# Altium PCB DSP_Expansion_Board.PcbDoc (part 2 of 3)
Units mil, origin at the board's own origin, x right, y up, seen from the top; angles counter-clockwise.
Board outline 7913.39 x 4448.82 mil, 4 copper layers (Top Layer, GND, inner signal, Bottom Layer), stack 23.78 mil thick; 392 components, 294 nets, 1167 pads, 457 vias.
Unrouted connection lines stored in the file: 108.
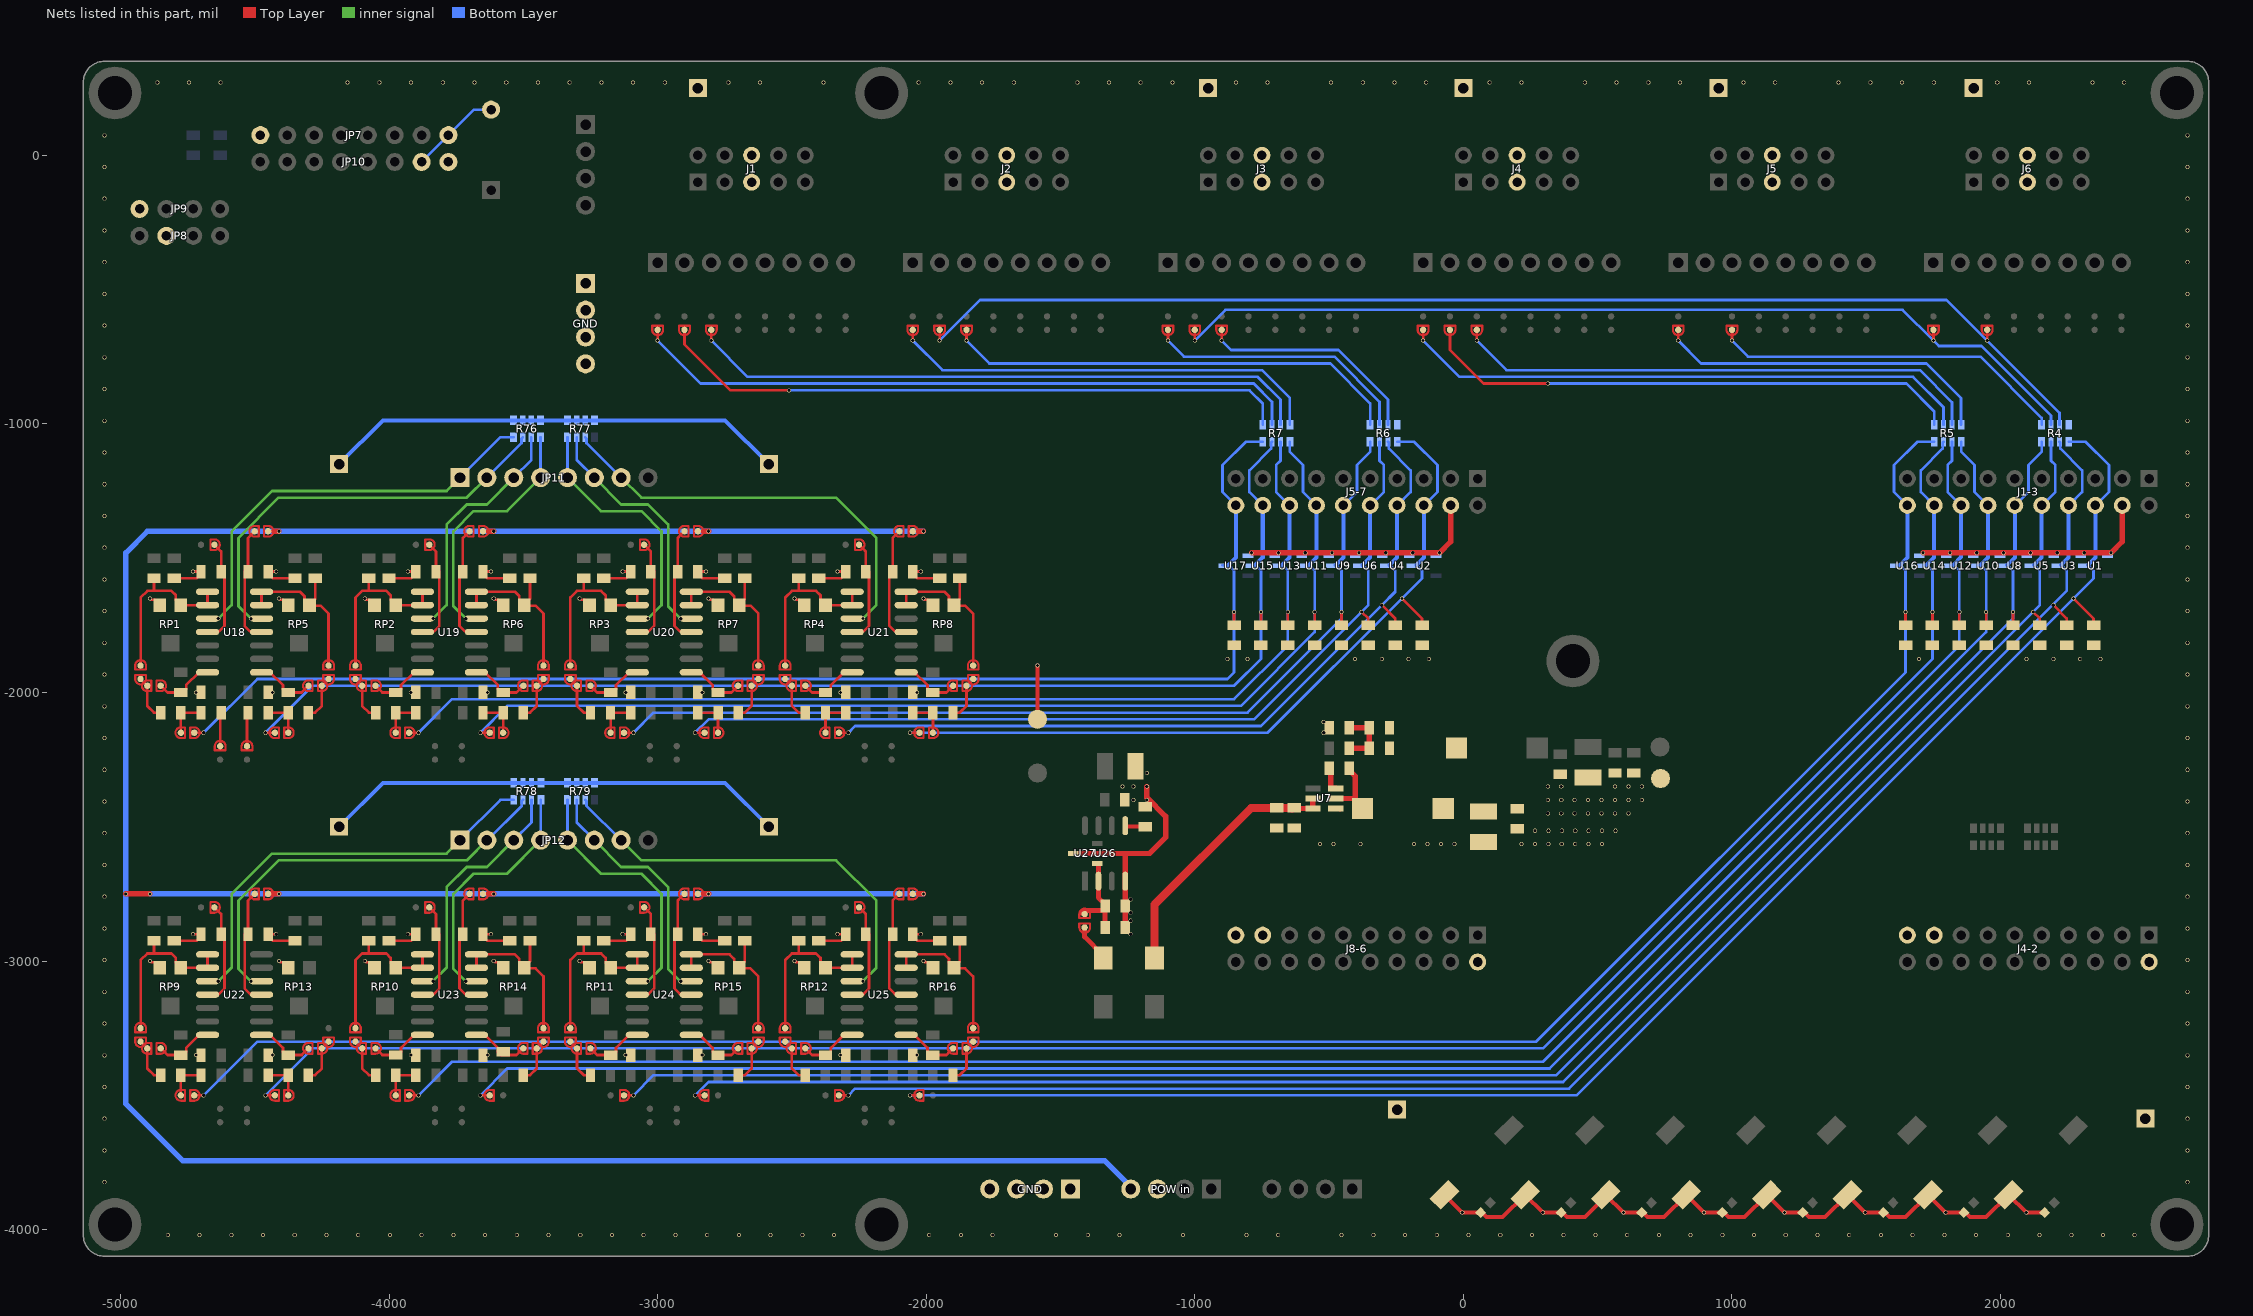
[diagram p4: the nets of this part, all layers, seen from the top]

## Via types
v1: diameter 15, hole 12, Top Layer to Bottom Layer, 457 vias

## Nets (pads, with @x,y where several pads share a name; then routed paths per layer and width w, separated by ;. In a path a pad name is that pad's centre, name@x,y a point inside that pad or via, vN(x,y) a via of type N, cw(c..) or ccw(c..) an arc to the next point about the centre after c; other vN are vias at no path point) (continued)
-12: "POW in.4" DE101.2 DE102.2 DE103.2 DE104.2 DE109.2 DE110.2 DE111.2 DE112.2 | length 12088.2
  Top Layer w20: v1(-4980,-2750) v1(-4890,-2750) ; DE109.2@-4450,-2750 -4430,-2750 v1(-4410,-2750) ; -4430,-1400 v1(-4410,-1400) ; -3630,-2750 v1(-3610,-2750) ; -3630,-1400 v1(-3610,-1400) ; -2830,-2750 v1(-2810,-2750) ; -2830,-1400 v1(-2810,-1400) ; -2030,-2750 v1(-2010,-2750) ; -2030,-1400 v1(-2010,-1400)
  Bottom Layer w20: v1(-4890,-2750) v1(-4410,-2750) v1(-3610,-2750) v1(-2810,-2750) v1(-2010,-2750) ; v1(-2010,-1400) v1(-2810,-1400) v1(-3610,-1400) v1(-4410,-1400) -4900,-1400 -4980,-1480 v1(-4980,-2750) -4980,-3532.15 -4768.85,-3743.3 -1335.44,-3743.3 -1228.74,-3850
A0: JP12.1 R78.1 U22.3 | length 1540.7
  inner signal w10: v1(-4635.58,-3075) -4585.58,-3025 -4585.58,-2750 -4435.58,-2600 -3785.58,-2600 JP12.1@-3735.58,-2550
  Bottom Layer w10: JP12.1@-3735.58,-2550 -3585.58,-2400 R78.1@-3535.58,-2400
A1: JP11.1 R76.1 U18.3 | length 1540.7
  inner signal w10: v1(-4635.58,-1725) -4585.58,-1675 -4585.58,-1400 -4435.58,-1250 -3785.58,-1250 JP11.1@-3735.58,-1200
  Bottom Layer w10: JP11.1@-3736.37,-1200 -3586.37,-1050 R76.1@-3536.37,-1050
A2: JP12.2 R78.2 U22.12 | length 1544.7
  inner signal w10: v1(-4514.09,-3075.48) -4560.58,-3028.99 -4560.58,-2775 -4410.58,-2625 -3710.58,-2625 JP12.2@-3635.58,-2550
  Bottom Layer w10: JP12.2@-3635.58,-2550 -3633.85,-2550 -3505.78,-2421.92 -3505.78,-2404.84 R78.2@-3500.93,-2400
A3: JP12.5 R79.1 U24.3 | length 928.3
  inner signal w10: JP12.5@-3335.58,-2550 -3210.58,-2675 -3060.58,-2675 -2985.58,-2750 -2985.58,-3025 v1(-3035.58,-3075)
  Bottom Layer w10: R79.1@-3335.58,-2400 -3335.18,-2400.39 JP12.5@-3335.18,-2549.61
A4: JP11.2 R76.2 U18.12 | length 1543
  inner signal w10: v1(-4514.09,-1725.48) -4560.58,-1678.99 -4560.58,-1425 -4410.58,-1275 -3710.58,-1275 JP11.2@-3635.58,-1200
  Bottom Layer w10: JP11.2@-3634.64,-1200 -3506.56,-1071.92 -3506.56,-1054.84 R76.2@-3501.72,-1050
A5: JP11.5 R77.1 U20.3 | length 928.3
  inner signal w10: JP11.5@-3335.58,-1200 -3210.58,-1325 -3060.58,-1325 -2985.58,-1400 -2985.58,-1675 v1(-3035.58,-1725)
  Bottom Layer w10: R77.1@-3335.58,-1050 -3335.18,-1050.39 JP11.5@-3335.18,-1199.61
ADC14: R4.8
ADC14~: C35.2 DE96.1 J1-3.6 R4.1 U1.3 | length 5998.2
  Top Layer w10: v1(-2060,-3500) -2045,-3500 DE96.1@-2025,-3500 ; v1(2271.26,-1650) 2346.26,-1725 C35.2@2346.26,-1750
  Bottom Layer w10: v1(-2060,-3500) -2047.16,-3500 421.26,-3500 v1(2271.26,-1650) 2346.26,-1575 2346.26,-1546.26 U1.3@2325.14,-1525.13 ; R4.1@2253.79,-1066.54 2316.78,-1066.54 2403.79,-1153.54 2403.79,-1253.54 J1-3.6@2353.79,-1303.54
  Bottom Layer w15: U1.3@2325.12,-1525.13 2353,-1497.26 J1-3.6@2353,-1323.54
ADC15: R6.8
ADC15~: C36.2 DE72.1 J5-7.6 R6.1 U2.3 | length 2959.6
  Top Layer w10: v1(-2060,-2150) -2045,-2150 DE72.1@-2025,-2150 ; v1(-228.74,-1650) -153.74,-1725 C36.2@-153.74,-1750
  Bottom Layer w10: v1(-2060,-2150) -728.74,-2150 v1(-228.74,-1650) -153.74,-1575 -153.74,-1546.26 -174.86,-1525.13 U2.3@-175.13,-1525.13 ; R6.1@-246.21,-1066.54 -183.22,-1066.54 -96.21,-1153.54 -96.21,-1253.54 J5-7.6@-146.21,-1303.54
  Bottom Layer w15: U2.3@-175.13,-1525.13 -147,-1497 J5-7.6@-147,-1303.32
ADCA0: DE10.1 R5.5 | length 2022.7
  Top Layer w10: DE10.1@-50,-650 -50,-670 -50,-725 75,-850 v1(314.42,-850)
  Bottom Layer w10: v1(314.42,-850) 1649.46,-850 1753,-953.54 R5.5@1753,-1003.54
ADCA0~: C54.2 DE89.1 J1-3.20 R5.4 U16.3 | length 8050.3
  Top Layer w10: DE89.1@-4725,-3500 -4705,-3500 v1(-4690,-3500) ; C54.2@1646.26,-1750 v1(1646.26,-1700)
  Bottom Layer w10: v1(-4690,-3500) -4490,-3300 271.26,-3300 1646.26,-1925 v1(1646.26,-1700) 1646.26,-1546.26 U16.3@1626.49,-1526.49 ; J1-3.20@1653,-1303.54 1603,-1253.54 1603,-1153.54 1690.01,-1066.54 R5.4@1753,-1066.54
  Bottom Layer w15: U16.3@1624.87,-1525.13 1653,-1497 J1-3.20@1653,-1323.54
ADCA1: DE7.1 R7.5 | length 2377.8
  Top Layer w10: DE7.1@-2900,-650 -2900,-670 -2900,-703.74 -2728.74,-875 v1(-2510.58,-875)
  Bottom Layer w10: v1(-2510.58,-875) -795.54,-875 -747,-923.54 R7.5@-747,-1003.54
ADCA1~: C55.2 DE65.1 J5-7.20 R7.4 U17.3 | length 5021.6
  Top Layer w10: DE65.1@-4725,-2150 -4705,-2150 v1(-4690,-2150) ; C55.2@-853.74,-1737.4 v1(-853.74,-1700)
  Bottom Layer w10: v1(-4690,-2150) -4490,-1950 -878.74,-1950 -853.74,-1925 v1(-853.74,-1700) -853.74,-1546.26 -873.51,-1526.49 U17.3@-896.59,-1526.49 ; J5-7.20@-847,-1303.54 -897,-1253.54 -897,-1153.54 -809.99,-1066.54 R7.4@-747,-1066.54
  Bottom Layer w15: U17.3@-875.13,-1525.13 -847,-1497 J5-7.20@-847,-1303.54
ADCA2: DE4.1 R5.6 | length 2145.8
  Top Layer w10: v1(-150,-690) -150,-670 DE4.1@-150,-650
  Bottom Layer w10: v1(-150,-690) -15,-825 1674.46,-825 1787.65,-938.19 R5.6@1787.65,-1003.54
ADCA2~: C52.2 DE90.1 J1-3.18 R5.3 U14.3 | length 7827.1
  Top Layer w10: v1(-4460,-3500) -4445,-3500 DE90.1@-4425,-3500 ; C52.2@1746.26,-1750 v1(1746.26,-1700)
  Bottom Layer w10: v1(-4460,-3500) -4285,-3325 296.26,-3325 1746.26,-1875 v1(1746.26,-1700) 1746.26,-1546.26 U14.3@1726.49,-1526.49 ; J1-3.18@1753,-1303.54 1703,-1253.54 1703,-1173.22 1784.28,-1091.94 1784.28,-1069.9 R5.3@1787.65,-1066.54
  Bottom Layer w15: U14.3@1724.87,-1525.13 1753,-1497 J1-3.18@1753,-1323.54
ADCA3: DE17.1 R4.5 | length 1337.8
  Top Layer w10: v1(1000,-690) 1000,-670 DE17.1@1000,-650
  Bottom Layer w10: v1(1000,-690) 1060,-750 1925,-750 2153,-978 R4.5@2153,-1003.54
ADCA3~: C46.2 DE93.1 J1-3.12 R4.4 U8.3 | length 6654.5
  Top Layer w10: DE93.1@-3125,-3500 -3105,-3500 v1(-3090,-3500) ; C46.2@2046.26,-1750 v1(2046.26,-1700)
  Bottom Layer w10: v1(-3090,-3500) -3015,-3425 -2983.58,-3425 346.26,-3425 2046.26,-1725 v1(2046.26,-1700) 2046.26,-1546.26 U8.3@2026.49,-1526.49 ; J1-3.12@2053.79,-1303.54 2103.79,-1253.54 2103.79,-1153.54 2153,-1104.33 R4.4@2153,-1066.54
  Bottom Layer w15: U8.3@2024.87,-1525.13 2053,-1497 J1-3.12@2053,-1323.54
ADCA4: DE1.1 R7.6 | length 2507.5
  Top Layer w10: v1(-3000,-690) -3000,-670 DE1.1@-3000,-650
  Bottom Layer w10: v1(-3000,-690) -2840,-850 -780.54,-850 -712.35,-918.19 R7.6@-712.35,-1003.54
ADCA4~: C53.2 DE66.1 J5-7.18 R7.3 U15.3 | length 4787.9
  Top Layer w10: v1(-4460,-2150) -4445,-2150 DE66.1@-4425,-2150 ; C53.2@-753.74,-1750 v1(-753.74,-1700)
  Bottom Layer w10: v1(-4460,-2150) -4285,-1975 -853.74,-1975 -753.74,-1875 v1(-753.74,-1700) -753.74,-1546.26 U15.3@-773.51,-1526.49 ; J5-7.18@-747,-1303.54 -797,-1253.54 -797,-1173.22 -715.72,-1091.94 -715.72,-1069.9 R7.3@-712.35,-1066.54
  Bottom Layer w15: U15.3@-775.13,-1525.13 -747,-1497 J5-7.18@-747,-1303.54
ADCA5: DE14.1 R6.5 | length 1719.7
  Top Layer w10: v1(-1850,-690) -1850,-670 DE14.1@-1850,-650
  Bottom Layer w10: v1(-1850,-690) -1765,-775 -495.54,-775 -347,-923.54 R6.5@-347,-1003.54
ADCA5~: C47.2 DE69.1 J5-7.12 R6.4 U9.3 | length 3615.6
  Top Layer w10: DE69.1@-3125,-2150 -3105,-2150 v1(-3090,-2150) ; C47.2@-453.74,-1750 v1(-453.74,-1700)
  Bottom Layer w10: v1(-3090,-2150) -3015,-2075 -803.74,-2075 -453.74,-1725 v1(-453.74,-1700) -453.74,-1546.26 U9.3@-473.51,-1526.49 ; J5-7.12@-446.21,-1303.54 -396.21,-1253.54 -396.21,-1153.54 -347,-1104.33 R6.4@-347,-1066.54
  Bottom Layer w15: U9.3@-475.13,-1525.13 -447,-1497 J5-7.12@-447,-1303.32
ADCB2: DE16.1 R5.7 | length 1988.1
  Top Layer w10: v1(50,-690) 50,-670 DE16.1@50,-650
  Bottom Layer w10: v1(50,-690) 160,-800 1699.46,-800 1819.15,-919.68 R5.7@1819.15,-1003.54
ADCB2~: C50.2 DE91.1 J1-3.16 R5.2 U12.3 | length 7289
  Top Layer w10: DE91.1@-3925,-3500 -3905,-3500 v1(-3890,-3500) ; C50.2@1846.26,-1737.4 v1(1846.26,-1700)
  Bottom Layer w10: v1(-3890,-3500) -3765,-3375 -3004.29,-3375 296.26,-3375 1846.26,-1825 v1(1846.26,-1700) 1846.26,-1546.26 U12.3@1825,-1525 ; R5.2@1819.15,-1066.54 1819.15,-1137.4 1803,-1153.54 1803,-1253.54 J1-3.16@1853,-1303.54
  Bottom Layer w15: U12.3@1824.26,-1525 1853,-1496.26 J1-3.16@1853,-1323.54
ADCB3: DE6.1 DE9.1 R4.6 | length 3512.6
  Top Layer w10: v1(-1000,-690) -1000,-670 DE9.1@-1000,-650 ; v1(1750,-690) 1750,-670 DE6.1@1750,-650
  Bottom Layer w10: v1(-1000,-690) -885.62,-575.62 1635.62,-575.62 v1(1750,-690) 1770,-710 1928.74,-710 2187.65,-968.91 R4.6@2187.65,-1003.54
ADCB3~: C44.2 DE94.1 J1-3.10 R4.3 U5.3 | length 6491.9
  Top Layer w10: v1(-2860,-3500) -2845,-3500 DE94.1@-2825,-3500 ; v1(2121.26,-1700) 2146.26,-1725 C44.2@2146.26,-1750
  Bottom Layer w10: v1(-2860,-3500) -2810,-3450 371.26,-3450 v1(2121.26,-1700) 2146.26,-1675 2146.26,-1546.26 U5.3@2126.49,-1526.49 ; J1-3.10@2153.79,-1303.54 2203.79,-1253.54 2203.79,-1153.54 2187.65,-1137.4 R4.3@2187.65,-1066.54
  Bottom Layer w15: U5.3@2124.87,-1525.13 2153,-1497 J1-3.10@2153,-1323.54
ADCB4: DE13.1 R7.7 | length 2344
  Top Layer w10: v1(-2800,-690) -2800,-670 DE13.1@-2800,-650
  Bottom Layer w10: v1(-2800,-690) -2665,-825 -765.54,-825 -680.85,-909.68 R7.7@-680.85,-1003.54
ADCB4~: C51.2 DE67.1 J5-7.16 R7.2 U13.3 | length 4260.2
  Top Layer w10: DE67.1@-3925,-2150 -3905,-2150 v1(-3890,-2150) ; C51.2@-653.74,-1750 v1(-653.74,-1700)
  Bottom Layer w10: v1(-3890,-2150) -3765,-2025 -853.74,-2025 -653.74,-1825 v1(-653.74,-1700) -653.74,-1546.26 U13.3@-673.51,-1526.49 ; R7.2@-680.85,-1066.54 -680.85,-1137.4 -697,-1153.54 -697,-1253.54 J5-7.16@-647,-1303.54
  Bottom Layer w15: U13.3@-675.13,-1525.13 -647,-1497 J5-7.16@-647,-1303.54
ADCB5: DE3.1 R6.6 | length 1007.5
  Top Layer w10: v1(-1100,-690) -1100,-670 DE3.1@-1100,-650
  Bottom Layer w10: v1(-1100,-690) -1040,-750 -480.54,-750 -312.35,-918.19 R6.6@-312.35,-1003.54
ADCB5~: C45.2 DE70.1 J5-7.10 R6.3 U6.3 | length 3452.9
  Top Layer w10: v1(-2860,-2150) -2845,-2150 DE70.1@-2825,-2150 ; v1(-378.74,-1700) -353.74,-1725 C45.2@-353.74,-1750
  Bottom Layer w10: v1(-2860,-2150) -2810,-2100 -778.74,-2100 v1(-378.74,-1700) -353.74,-1675 -353.74,-1546.26 U6.3@-373.51,-1526.49 ; J5-7.10@-346.21,-1303.54 -296.21,-1253.54 -296.21,-1153.54 -312.35,-1137.4 R6.3@-312.35,-1066.54
  Bottom Layer w15: U6.3@-375.13,-1525.13 -347,-1497 J5-7.10@-347,-1303.32
ADCC2: DE5.1 R5.8 | length 1281.8
  Top Layer w10: v1(800,-690) 800,-670 DE5.1@800,-650
  Bottom Layer w10: v1(800,-690) 885,-775 1724.46,-775 1853,-903.54 1853,-1002.76 R5.8@1853.79,-1003.54
ADCC2~: C48.2 DE92.1 J1-3.14 R5.1 U10.3 | length 7153.8
  Top Layer w10: v1(-3660,-3500) -3645,-3500 DE92.1@-3625,-3500 ; C48.2@1946.26,-1750 v1(1946.26,-1700)
  Bottom Layer w10: v1(-3660,-3500) -3560,-3400 -2993.93,-3400 321.26,-3400 1946.26,-1775 v1(1946.26,-1700) 1946.26,-1546.26 U10.3@1926.49,-1526.49 ; R5.1@1853.79,-1066.54 1853.79,-1104.33 1903,-1153.54 1903,-1253.54 J1-3.14@1953,-1303.54
  Bottom Layer w15: U10.3@1924.87,-1525.13 1953,-1497 J1-3.14@1953,-1323.54
ADCC3: DE8.1 DE18.1 R4.7 | length 4530.2
  Top Layer w10: v1(-1950,-690) -1950,-670 DE8.1@-1950,-650 ; v1(1950,-690) 1950,-670 DE18.1@1950,-650
  Bottom Layer w10: v1(-1950,-690) -1798.9,-538.9 1798.9,-538.9 v1(1950,-690) 2219.15,-959.15 R4.7@2219.15,-1003.54
ADCC3~: C42.2 DE95.1 J1-3.8 R4.2 U3.3 | length 6054.5
  Top Layer w10: DE95.1@-2325,-3500 -2305,-3500 v1(-2290,-3500) ; v1(2196.26,-1675) 2246.26,-1725 C42.2@2246.26,-1750
  Bottom Layer w10: v1(-2290,-3500) -2265,-3475 392.98,-3475 2246.26,-1621.72 2246.26,-1546.26 U3.3@2226.49,-1526.49 ; R4.2@2219.15,-1066.54 2222.51,-1069.9 2222.51,-1091.94 2303.79,-1173.22 2303.79,-1253.54 J1-3.8@2253.79,-1303.54
  Bottom Layer w15: U3.3@2225.01,-1525.25 2253,-1497.26 J1-3.8@2253,-1323.54
ADCC4: DE2.1 R7.8 | length 1631.8
  Top Layer w10: v1(-2050,-690) -2050,-670 DE2.1@-2050,-650
  Bottom Layer w10: v1(-2050,-690) -1940,-800 -750.54,-800 -646.21,-904.33 R7.8@-646.21,-1003.54
ADCC4~: C49.2 DE68.1 J5-7.14 R7.1 U11.3 | length 4114.6
  Top Layer w10: v1(-3660,-2150) -3645,-2150 DE68.1@-3625,-2150 ; C49.2@-553.74,-1750 v1(-553.74,-1700)
  Bottom Layer w10: v1(-3660,-2150) -3560,-2050 -828.74,-2050 -553.74,-1775 v1(-553.74,-1700) -553.74,-1546.26 U11.3@-573.51,-1526.49 ; R7.1@-646.21,-1066.54 -646.21,-1104.33 -597,-1153.54 -597,-1253.54 J5-7.14@-547,-1303.54
  Bottom Layer w15: U11.3@-575.13,-1525.13 -547,-1497 J5-7.14@-547,-1303.54
ADCC5: DE15.1 R6.7 | length 844
  Top Layer w10: v1(-900,-690) -900,-670 DE15.1@-900,-650
  Bottom Layer w10: v1(-900,-690) -865,-725 -465.54,-725 -280.85,-909.69 R6.7@-280.85,-1003.54
ADCC5~: C43.2 DE71.1 J5-7.8 R6.2 U4.3 | length 3017.4
  Top Layer w10: DE71.1@-2325,-2150 -2305,-2150 v1(-2290,-2150) ; v1(-303.74,-1675) -253.74,-1725 C43.2@-253.74,-1750
  Bottom Layer w10: v1(-2290,-2150) -2265,-2125 -753.74,-2125 v1(-303.74,-1675) -253.74,-1625 -253.74,-1546.26 U4.3@-273.51,-1526.49 ; R6.2@-280.85,-1066.54 -277.49,-1069.9 -277.49,-1091.94 -196.21,-1173.22 -196.21,-1253.54 J5-7.8@-246.21,-1303.54
  Bottom Layer w15: U4.3@-275.13,-1525.13 -247,-1497 J5-7.8@-247,-1303.32
B2: JP12.3 R78.3 U23.3 | length 870.6
  inner signal w10: v1(-3835.58,-3075) -3785.58,-3025 -3785.58,-2725 -3710.58,-2650 -3635.58,-2650 JP12.3@-3535.58,-2550
  Bottom Layer w10: JP12.3@-3535.58,-2550 -3469.44,-2483.86 R78.3@-3469.44,-2400
B3: JP12.6 R79.2 U24.12 | length 894.6
  inner signal w10: JP12.6@-3235.58,-2550 -3135.58,-2650 -3035.58,-2650 -2960.58,-2725 -2960.58,-3028.99 v1(-2914.09,-3075.48)
  Bottom Layer w10: R79.2@-3300.93,-2400 -3300.93,-2483.86 JP12.6@-3234.79,-2550
B4: JP11.3 R76.3 U19.3 | length 870.6
  inner signal w10: v1(-3835.58,-1725) -3785.58,-1675 -3785.58,-1375 -3710.58,-1300 -3635.58,-1300 JP11.3@-3535.58,-1200
  Bottom Layer w10: JP11.3@-3536.37,-1200 -3470.22,-1133.86 R76.3@-3470.22,-1050
B5: JP11.6 R77.2 U20.12 | length 894.6
  inner signal w10: JP11.6@-3235.58,-1200 -3135.58,-1300 -3035.58,-1300 -2960.58,-1375 -2960.58,-1678.99 v1(-2914.09,-1725.48)
  Bottom Layer w10: R77.2@-3300.93,-1050 -3300.93,-1133.86 JP11.6@-3234.79,-1200
BL: JP7.8 JP10.7 SW9.2 | length 339.5
  Bottom Layer w10: JP10.7@-3878.74,-25 JP7.8@-3778.74,75 -3683.87,169.87 -3620.13,169.87 SW9.2@-3620,170
C2: JP12.4 R78.4 U23.12 | length 902.9
  inner signal w10: v1(-3714.09,-3075.48) -3760.58,-3028.99 -3760.58,-2750 -3685.58,-2675 -3560.58,-2675 JP12.4@-3435.58,-2550
  Bottom Layer w10: JP12.4@-3435.58,-2550 -3435.18,-2549.61 -3435.18,-2400.39 R78.4@-3434.79,-2400
C3: JP12.7 R79.3 U25.3 | length 1569
  inner signal w10: JP12.7@-3135.58,-2550 -3060.58,-2625 -2335.58,-2625 -2185.58,-2775 -2185.58,-3025 v1(-2235.58,-3075)
  Bottom Layer w10: R79.3@-3269.44,-2400 -3264.59,-2404.84 -3264.59,-2421.92 JP12.7@-3136.52,-2550
C4: JP11.4 R76.4 U19.12 | length 902.3
  inner signal w10: v1(-3714.09,-1725.48) -3760.58,-1678.99 -3760.58,-1400 -3685.58,-1325 -3560.58,-1325 JP11.4@-3435.58,-1200
  Bottom Layer w10: JP11.4@-3435.97,-1199.61 -3435.97,-1050.39 R76.4@-3435.58,-1050
C5: JP11.7 R77.3 U21.3 | length 1569
  inner signal w10: JP11.7@-3135.58,-1200 -3060.58,-1275 -2335.58,-1275 -2185.58,-1425 -2185.58,-1675 v1(-2235.58,-1725)
  Bottom Layer w10: R77.3@-3269.44,-1050 -3264.59,-1054.84 -3264.59,-1071.92 JP11.7@-3136.52,-1200
DAC1: J4-2.17
DAC2: J4-2.19
DAC3: J8-6.17
DAC4: J8-6.19
GND: "POW in.3" C3.1 C4.1 C5.1 C6.1 C7.1 C8.1 C9.1 C10.1 C11.2 C12.2 C13.2 C14.2 C15.2 C16.2 C17.2 C18.2 C19.1 C20.1 C21.1 C22.1 C23.1 C24.1 C25.1 C26.1 C27.1 C28.1 C29.1 C30.1 C31.1 C32.1 C33.1 C34.1 C35.1 C36.1 C37.1 C38.1 C39.1 C40.1 C41.1 C42.1 C43.1 C44.1 C45.1 C46.1 C47.1 C48.1 C49.1 C50.1 C51.1 C52.1 C53.1 C54.1 C55.1 GND.1 GND.2 GND.3 GND.4 J1-3.4 J1.5 J1.6 J2.5 J2.6 J3.5 J3.6 J4-2.2 J4.5 J4.6 J5-7.4 J5.5 J5.6 J6.5 J6.6 J8-6.2 JP7.1 JP8.2 JP9.1 JP10.8 R3.1 R8.2 R9.2 R10.2 R11.2 R12.2 R13.2 R14.2 R15.2 R40.2 R41.2 R42.2 R43.2 R44.2 R45.2 R46.2 R47.2 R76.5 R76.6 R76.7 R76.8 R77.5 R77.6 R77.7 R77.8 R78.5 R78.6 R78.7 R78.8 R79.5 R79.6 R79.7 R79.8 R81.1 R82.1 R85.1 R86.1 R89.1 R90.1 R93.1 R94.1 R97.1 R98.1 R101.1 R102.1 R105.1 R106.1 R109.1 R110.1 RP1.3 RP2.3 RP3.3 RP4.3 RP5.3 RP6.3 RP7.3 RP8.3 RP9.3 RP10.3 RP11.3 RP12.3 RP13.3 RP14.3 RP15.3 RP16.3 SW1.2 SW2.2 SW3.2 SW4.2 SW5.2 SW6.2 SW7.2 SW8.2 U1.1 U2.1 U3.1 U4.1 U5.1 U6.1 U7.4 U8.1 U9.1 U10.1 U11.1 U12.1 U13.1 U14.1 U15.1 U16.1 U17.1 U26.4 U27.3 | length 13268.1
  Top Layer w10: v1(-4890,-3000) -4888.65,-3000 -4884.24,-3004.41 -4872.36,-3004.41 -4853.74,-3023.03 RP9.3@-4853.74,-3025 ; v1(-4890,-1650) -4888.65,-1650 -4884.24,-1654.41 RP1.3@-4872.36,-1654.41 ; R97.1@-4800,-2925 -4717.5,-2925 -4700,-2907.5 C27.1@-4700,-2900 v1(-4730,-2900) ; R81.1@-4800,-1575 -4717.5,-1575 -4700,-1557.5 C19.1@-4700,-1550 v1(-4730,-1550) ; C31.1@-4450,-2907.5 -4432.5,-2925 R98.1@-4350,-2925 ; C31.1@-4450,-2900 v1(-4420,-2900) ; C23.1@-4450,-1557.5 -4432.5,-1575 R82.1@-4350,-1575 ; C23.1@-4450,-1550 v1(-4420,-1550) ; v1(-4410,-3000) -4408.65,-3000 -4404.24,-3004.41 -4393.62,-3004.41 -4375,-3023.03 RP13.3@-4375,-3025 ; v1(-4410,-1650) -4408.65,-1650 -4404.24,-1654.41 RP5.3@-4393.62,-1654.41 ; v1(-4090,-3000) -4088.65,-3000 -4084.24,-3004.41 RP10.3@-4072.36,-3004.41 ; v1(-4090,-1650) -4088.65,-1650 -4084.24,-1654.41 RP2.3@-4072.36,-1654.41 ; R101.1@-4000,-2925 -3917.5,-2925 -3900,-2907.5 C28.1@-3900,-2900 v1(-3930,-2900) ; R85.1@-4000,-1575 -3917.5,-1575 -3900,-1557.5 C20.1@-3900,-1550 v1(-3930,-1550) ; C32.1@-3650,-2907.5 -3632.5,-2925 R102.1@-3550,-2925 ; C32.1@-3650,-2900 v1(-3620,-2900) ; C24.1@-3650,-1557.5 -3632.5,-1575 R86.1@-3550,-1575 ; C24.1@-3650,-1550 v1(-3620,-1550) ; v1(-3610,-3000) -3608.65,-3000 -3604.24,-3004.41 RP14.3@-3593.62,-3004.41 ; v1(-3610,-1650) -3608.65,-1650 -3604.24,-1654.41 RP6.3@-3593.62,-1654.41 ; v1(-3290,-3000) -3288.65,-3000 -3284.24,-3004.41 RP11.3@-3272.36,-3004.41 ; v1(-3290,-1650) -3288.65,-1650 -3284.24,-1654.41 RP3.3@-3272.36,-1654.41 ; R105.1@-3200,-2925 -3117.5,-2925 -3100,-2907.5 C29.1@-3100,-2900 v1(-3130,-2900) ; R89.1@-3200,-1575 -3117.5,-1575 -3100,-1557.5 C21.1@-3100,-1550 v1(-3130,-1550) ; C33.1@-2850,-2907.5 -2832.5,-2925 R106.1@-2750,-2925 ; C33.1@-2850,-2900 v1(-2820,-2900) ; C25.1@-2850,-1557.5 -2832.5,-1575 R90.1@-2750,-1575 ; C25.1@-2850,-1550 v1(-2820,-1550) ; v1(-2810,-3000) -2808.65,-3000 -2804.24,-3004.41 RP15.3@-2793.62,-3004.41 ; v1(-2810,-1650) -2808.65,-1650 -2804.24,-1654.41 RP7.3@-2793.62,-1654.41 ; v1(-2490,-3000) -2488.65,-3000 -2484.24,-3004.41 RP12.3@-2472.36,-3004.41 ; v1(-2490,-1650) -2488.65,-1650 -2484.24,-1654.41 RP4.3@-2472.36,-1654.41 ; R109.1@-2400,-2925 -2317.5,-2925 -2300,-2907.5 C30.1@-2300,-2900 v1(-2330,-2900) ; R93.1@-2400,-1575 -2317.5,-1575 -2300,-1557.5 C22.1@-2300,-1550 v1(-2330,-1550) ; C26.1@-2050,-1557.5 -2032.5,-1575 R94.1@-1950,-1575 ; C26.1@-2050,-1550 v1(-2020,-1550) ; v1(-2020,-2900) C34.1@-2050,-2900 -2050,-2907.5 -2032.5,-2925 R110.1@-1950,-2925 ; v1(-2010,-3000) -2008.65,-3000 -2004.24,-3004.41 RP16.3@-1993.62,-3004.41 ; v1(-2010,-1650) -2008.65,-1650 -2004.24,-1654.41 RP8.3@-1993.62,-1654.41
  Top Layer w15: GND.1@-1585.58,-2100 v1(-1585.58,-1900) ; U7.4@-475,-2432.09 -463.33,-2432.09 U7.4@-460,-2435.41 ; SW1.2@-70.21,-3870.21 v1(-4.23,-3936.19) 68.96,-3936.19 86.31,-3953.54 146.46,-3953.54 SW2.2@229.79,-3870.21 v1(295.77,-3936.19) 368.96,-3936.19 386.31,-3953.54 453,-3953.54 529.79,-3876.76 SW3.2@529.79,-3870.21 v1(595.77,-3936.19) 668.96,-3936.19 686.31,-3953.54 746.46,-3953.54 SW4.2@829.79,-3870.21 v1(895.77,-3936.19) 968.96,-3936.19 986.31,-3953.54 1046.46,-3953.54 SW5.2@1129.79,-3870.21 v1(1195.77,-3936.19) 1268.96,-3936.19 1286.31,-3953.54 1346.46,-3953.54 SW6.2@1429.79,-3870.21 v1(1495.77,-3936.19) 1568.96,-3936.19 1586.31,-3953.54 1646.46,-3953.54 SW7.2@1729.79,-3870.21 v1(1795.77,-3936.19) 1868.96,-3936.19 1886.31,-3953.54 1946.46,-3953.54 SW8.2@2029.79,-3870.21 v1(2095.77,-3936.19) C11.2@2163.81,-3936.19
  Top Layer w20: U27.3@-1451.93,-2599.41 -1258.74,-2599.41 ; C38.1@-1259.02,-2875 -1258.92,-2874.9 -1258.92,-2702.85 U26.4@-1258.82,-2702.76 -1258.82,-2599.49 -1258.74,-2599.41 ; v1(-1178.74,-2350) -1178.74,-2391.41 -1108.74,-2461.41 -1108.74,-2540 -1168.15,-2599.41 -1258.74,-2599.41 ; v1(-788.74,-1480) v1(-688.74,-1480) v1(-588.74,-1480) v1(-488.74,-1480) v1(-388.74,-1480) v1(-288.74,-1480) v1(-188.74,-1480) v1(-88.74,-1480) -47,-1438.26 J5-7.4@-47,-1303.54 ; v1(1711.26,-1480) v1(1811.26,-1480) v1(1911.26,-1480) v1(2011.26,-1480) v1(2111.26,-1480) v1(2211.26,-1480) v1(2311.26,-1480) v1(2411.26,-1480) 2453,-1438.26 J1-3.4@2453,-1303.54
  Bottom Layer w15: GND.1@-4185.58,-2500 -4022.59,-2337.01 R78.8@-3535.58,-2337.01 R78.7@-3500.93,-2337.01 R78.6@-3469.44,-2337.01 R78.5@-3434.79,-2337.01 R79.8@-3335.58,-2337.01 R79.7@-3300.93,-2337.01 R79.6@-3269.44,-2337.01 R79.5@-3234.79,-2337.01 -2748.57,-2337.01 GND.1@-2585.58,-2500 ; GND.1@-4185.58,-1150 -4022.59,-987.01 ; R76.8@-3535.58,-987.01 -4022.59,-987.01 ; R76.7@-3500.93,-987.01 -4022.59,-987.01 ; R76.6@-3469.44,-987.01 -4022.59,-987.01 ; GND.1@-2585.58,-1150 -2748.57,-987.01 R77.5@-3234.79,-987.01 R77.6@-3269.44,-987.01 R77.7@-3300.93,-987.01 R77.8@-3335.58,-987.01 -4022.59,-987.01
  other v1: -4823.37,-4020.08 -4705.26,-4020.08 -4587.15,-4020.08 -4469.04,-4020.08 -4350.93,-4020.08 -4232.82,-4020.08 -4114.71,-4020.08 -3996.6,-4020.08 -3878.49,-4020.08 -3760.38,-4020.08 -3642.27,-4020.08 -3524.16,-4020.08 -3406.05,-4020.08 -3287.94,-4020.08 -3169.83,-4020.08 -3051.72,-4020.08 -2933.61,-4020.08 -2815.5,-4020.08 -2697.39,-4020.08 -2579.28,-4020.08 -2461.17,-4020.08 -2343.06,-4020.08 -1988.73,-4020.08 -1870.62,-4020.08 -1752.51,-4020.08 -1516.29,-4020.08 -1398.18,-4020.08 -1280.07,-4020.08 -1043.85,-4020.08 -807.63,-4020.08 -689.52,-4020.08 -453.3,-4020.08 -335.18,-4020.08 -217.07,-4020.08 -98.96,-4020.08 19.15,-4020.08 137.26,-4020.08 255.37,-4020.08 373.48,-4020.08 491.59,-4020.08 609.7,-4020.08 727.81,-4020.08 845.92,-4020.08 964.03,-4020.08 1082.14,-4020.08 1200.25,-4020.08 1318.36,-4020.08 1436.47,-4020.08 1554.58,-4020.08 1672.69,-4020.08 1790.8,-4020.08 1908.91,-4020.08 2027.02,-4020.08 2145.13,-4020.08 2263.24,-4020.08 2381.35,-4020.08 2499.46,-4020.08 -5059.59,-3823.23 2696.31,-3823.23 -5059.59,-3705.12 2696.31,-3705.12 -5059.59,-3587.01 2696.31,-3587.01 -5059.59,-3468.9 2696.31,-3468.9 -5059.59,-3350.79 2696.31,-3350.79 -4718.74,-3350 -4433.74,-3350 -3918.74,-3350 -3633.74,-3350 -3118.74,-3350 -2833.74,-3350 -2318.74,-3350 -2033.74,-3350 -5059.59,-3232.68 2696.31,-3232.68 -5059.59,-3114.57 2696.31,-3114.57 -5059.59,-2996.46 2696.31,-2996.46 -1238.74,-2900 -5059.59,-2878.35 2696.31,-2878.35 -1238.74,-2850 -1238.74,-2820 -1238.74,-2770 -5059.59,-2760.24 2696.31,-2760.24 -5059.59,-2642.13 2696.31,-2642.13 -533.82,-2564.51 -483.82,-2564.51 -383.82,-2564.51 -183.82,-2564.51 -133.82,-2564.51 -83.82,-2564.51 -33.82,-2564.51 216.18,-2564.51 266.18,-2564.51 316.18,-2564.51 366.18,-2564.51 416.18,-2564.51 466.18,-2564.51 516.18,-2564.51 -5059.59,-2524.02 2696.31,-2524.02 266.55,-2514.87 316.55,-2514.87 366.55,-2514.87 416.55,-2514.87 466.55,-2514.87 516.55,-2514.87 566.55,-2514.87 314.42,-2450 364.42,-2450 414.42,-2450 464.42,-2450 514.42,-2450 564.42,-2450 614.42,-2450 -5059.59,-2405.91 2696.31,-2405.91 -1228.74,-2400 -1178.74,-2400 314.42,-2400 364.42,-2400 414.42,-2400 464.42,-2400 514.42,-2400 564.42,-2400 614.42,-2400 664.42,-2400 -1268.74,-2350 -1228.74,-2350 314.42,-2350 364.42,-2350 564.42,-2350 614.42,-2350 664.42,-2350 -1178.74,-2300 -5059.59,-2287.8 2696.31,-2287.8 -5059.59,-2169.69 2696.31,-2169.69 -520,-2150 -520,-2110 -5059.59,-2051.57 2696.31,-2051.57 -4718.74,-2000 -4433.74,-2000 -3918.74,-2000 -3633.74,-2000 -3118.74,-2000 -2833.74,-2000 -2318.74,-2000 -2033.74,-2000 -5059.59,-1933.46 2696.31,-1933.46 -878.74,-1875 -803.74,-1875 -403.74,-1875 -303.74,-1875 -203.74,-1875 -128.74,-1875 1696.26,-1875 2096.26,-1875 2196.26,-1875 2296.26,-1875 2371.26,-1875 -5059.59,-1815.35 2696.31,-1815.35 -5059.59,-1697.24 2696.31,-1697.24 -5059.59,-1579.13 2696.31,-1579.13 -5059.59,-1461.02 2696.31,-1461.02 -5059.59,-1342.91 2696.31,-1342.91 -5059.59,-1224.8 2696.31,-1224.8 -5059.59,-1106.69 2696.31,-1106.69 -5059.59,-988.58 2696.31,-988.58 -5059.59,-870.47 2696.31,-870.47 -5059.59,-752.36 2696.31,-752.36 -5059.59,-634.25 2696.31,-634.25 -5059.59,-516.14 2696.31,-516.14 -5059.59,-398.03 2696.31,-398.03 -5059.59,-279.92 2696.31,-279.92 -5059.59,-161.81 2696.31,-161.81 -5059.59,-43.7 2696.31,-43.7 -5059.59,74.41 2696.31,74.41 -4862.74,271.26 -4744.63,271.26 -4626.52,271.26 -4154.08,271.26 -4035.97,271.26 -3917.86,271.26 -3799.75,271.26 -3681.64,271.26 -3563.53,271.26 -3445.42,271.26 -3327.31,271.26 -3209.2,271.26 -3091.09,271.26 -2972.98,271.26 -2736.76,271.26 -2618.65,271.26 -2382.43,271.26 -2028.1,271.26 -1909.99,271.26 -1791.88,271.26 -1673.77,271.26 -1437.55,271.26 -1319.44,271.26 -1201.33,271.26 -1083.22,271.26 -847,271.26 -728.89,271.26 -492.67,271.26 -374.55,271.26 -256.44,271.26 -138.33,271.26 97.89,271.26 216,271.26 452.22,271.26 570.33,271.26 688.44,271.26 806.55,271.26 1042.77,271.26 1160.88,271.26 1397.1,271.26 1515.21,271.26 1633.32,271.26 1751.43,271.26 1987.65,271.26 2105.76,271.26 2341.98,271.26 2460.09,271.26
NetC1_1: C1.1 R1.1 R2.2 R3.2 | length 225
  Top Layer w20: R2.2@-425,-2207.09 R1.1@-350,-2207.09 C1.1@-350,-2132.09 R3.2@-425,-2132.09
NetC1_2: C1.2 C5.2 C6.2 L1.2 L2.1 R1.2
NetC2_1: C2.1 U7.6 | length 95.8
  Top Layer w20: C2.1@-499.8,-2282.09 -496.67,-2285.22 -496.67,-2296.87 -493.54,-2300 -493.54,-2356.46 -492.72,-2357.28 U7.6@-475,-2357.28
NetC2_2: C2.2 L1.1 U7.5 | length 237.2
  Top Layer w20: U7.5@-475,-2394.69 -412.4,-2394.69 -404.37,-2402.72 L1.1@-375,-2432.09 ; C2.2@-425,-2282.09 -425,-2289.59 -403,-2311.59 L1.1@-403,-2394.69
NetC3_2: C3.2 C4.2 D1.2 U7.2 U7.3 | length 965.9
  Top Layer w20: C3.2@-630,-2430 ccw(c-627.91,-2430) -627.91,-2432.09 U7.3@-560.47,-2432.09 ; U7.3@-559.65,-2432.09 U7.3@-560.47,-2432.09 ; U7.2@-559.65,-2394.69 ccw(c-559.65,-2395.51) -560.47,-2395.51 U7.3@-560.47,-2432.09
  Top Layer w30: D1.2@-1150,-2984.45 -1150,-2790 -790,-2430 C4.2@-694.07,-2430 -640,-2430 C3.2@-637.91,-2432.09
NetC19_2: C19.2 DE82.1 U18.4 | length 384.8
  Top Layer w10: U18.4@-4675.47,-1775 -4672.87,-1772.39 -4633.05,-1772.39 -4612.6,-1751.95 C19.2@-4612.6,-1550 ; DE82.1@-4650,-1450 -4635.86,-1464.14 -4625,-1475 -4625,-1549.8 C19.2@-4625.2,-1550
NetC20_2: C20.2 DE98.1 U19.4 | length 385.1
  Top Layer w10: U19.4@-3875.47,-1775 -3872.87,-1772.39 -3833.05,-1772.39 -3812.6,-1751.95 C20.2@-3812.6,-1550 ; DE98.1@-3850,-1450 -3835.86,-1464.14 -3825,-1475 C20.2@-3825,-1549.8 ; C20.2@-3825,-1549.8 C20.2@-3825.2,-1550 C20.2@-3825,-1549.8
NetC21_2: C21.2 DE99.1 U20.4 | length 405.1
  Top Layer w10: U20.4@-3075.47,-1775 -3072.87,-1772.39 -3033.05,-1772.39 -3012.6,-1751.95 C21.2@-3012.6,-1550 ; -3035.86,-1464.14 DE99.1@-3050,-1450 -3035.86,-1464.14 ; -3035.86,-1464.14 -3025,-1475 C21.2@-3025,-1549.8 ; C21.2@-3025,-1549.8 C21.2@-3025.2,-1550 C21.2@-3025,-1549.8
NetC22_2: C22.2 DE100.1 U21.4 | length 384.8
  Top Layer w10: U21.4@-2275.47,-1775 -2272.87,-1772.39 -2233.05,-1772.39 -2212.6,-1751.95 C22.2@-2212.6,-1550 ; DE100.1@-2250,-1450 -2235.86,-1464.14 -2225,-1475 -2225,-1549.8 C22.2@-2225.2,-1550
NetC23_2: C23.2 DE101.1 U18.11 | length 434.8
  Top Layer w10: C23.2@-4537.4,-1550 -4537.4,-1751.95 -4516.95,-1772.39 -4477.13,-1772.39 U18.11@-4474.53,-1775 ; C23.2@-4524.8,-1550 -4525,-1549.8 -4525,-1425 -4514.14,-1414.14 DE101.1@-4500,-1400
NetC24_2: C24.2 DE102.1 U19.11 | length 435.1
  Top Layer w10: C24.2@-3737.4,-1550 -3737.4,-1751.95 -3716.95,-1772.39 -3677.13,-1772.39 U19.11@-3674.53,-1775 ; DE102.1@-3700,-1400 -3714.14,-1414.14 -3725,-1425 C24.2@-3725,-1549.8 ; C24.2@-3725,-1549.8 C24.2@-3724.8,-1550 C24.2@-3725,-1549.8
NetC25_2: C25.2 DE103.1 U20.11 | length 434.8
  Top Layer w10: C25.2@-2937.4,-1550 -2937.4,-1751.95 -2916.95,-1772.39 -2877.13,-1772.39 U20.11@-2874.53,-1775 ; C25.2@-2924.8,-1550 -2925,-1549.8 -2925,-1425 -2914.14,-1414.14 DE103.1@-2900,-1400
NetC26_2: C26.2 DE104.1 U21.11 | length 434.8
  Top Layer w10: C26.2@-2137.4,-1550 -2137.4,-1751.95 -2116.95,-1772.39 -2077.13,-1772.39 U21.11@-2074.53,-1775 ; C26.2@-2124.8,-1550 -2125,-1549.8 -2125,-1425 -2114.14,-1414.14 DE104.1@-2100,-1400
NetC27_2: C27.2 DE105.1 U22.4 | length 384.8
  Top Layer w10: U22.4@-4675.47,-3125 -4672.87,-3122.39 -4633.05,-3122.39 -4612.6,-3101.95 C27.2@-4612.6,-2900 ; DE105.1@-4650,-2800 -4635.86,-2814.14 -4625,-2825 -4625,-2899.8 C27.2@-4625.2,-2900
NetC28_2: C28.2 DE106.1 U23.4 | length 384.8
  Top Layer w10: U23.4@-3875.47,-3125 -3872.87,-3122.39 -3833.05,-3122.39 -3812.6,-3101.95 C28.2@-3812.6,-2900 ; DE106.1@-3850,-2800 -3835.86,-2814.14 -3825,-2825 -3825,-2899.8 C28.2@-3825.2,-2900
NetC29_2: C29.2 DE107.1 U24.4 | length 384.8
  Top Layer w10: U24.4@-3075.47,-3125 -3072.87,-3122.39 -3033.05,-3122.39 -3012.6,-3101.95 C29.2@-3012.6,-2900 ; DE107.1@-3050,-2800 -3035.86,-2814.14 -3025,-2825 -3025,-2899.8 C29.2@-3025.2,-2900
NetC30_2: C30.2 DE108.1 U25.4 | length 384.8
  Top Layer w10: U25.4@-2275.47,-3125 -2272.87,-3122.39 -2233.05,-3122.39 -2212.6,-3101.95 C30.2@-2212.6,-2900 ; DE108.1@-2250,-2800 -2235.86,-2814.14 -2225,-2825 -2225,-2899.8 C30.2@-2225.2,-2900
NetC31_2: C31.2 DE109.1 U22.11 | length 434.8
  Top Layer w10: C31.2@-4537.4,-2900 -4537.4,-3101.95 -4516.95,-3122.39 -4477.13,-3122.39 U22.11@-4474.53,-3125 ; C31.2@-4524.8,-2900 -4525,-2899.8 -4525,-2775 -4514.14,-2764.14 DE109.1@-4500,-2750
NetC32_2: C32.2 DE110.1 U23.11 | length 434.8
  Top Layer w10: C32.2@-3737.4,-2900 -3737.4,-3101.95 -3716.95,-3122.39 -3677.13,-3122.39 U23.11@-3674.53,-3125 ; C32.2@-3724.8,-2900 -3725,-2899.8 -3725,-2775 -3714.14,-2764.14 DE110.1@-3700,-2750
NetC33_2: C33.2 DE111.1 U24.11 | length 434.8
  Top Layer w10: C33.2@-2937.4,-2900 -2937.4,-3101.95 -2916.95,-3122.39 -2877.13,-3122.39 U24.11@-2874.53,-3125 ; C33.2@-2924.8,-2900 -2925,-2899.8 -2925,-2775 -2914.14,-2764.14 DE111.1@-2900,-2750
NetC34_2: C34.2 DE112.1 U25.11 | length 434.8
  Top Layer w10: C34.2@-2137.4,-2900 -2137.4,-3101.95 -2116.95,-3122.39 -2077.13,-3122.39 U25.11@-2074.53,-3125 ; C34.2@-2124.8,-2900 -2125,-2899.8 -2125,-2775 -2114.14,-2764.14 DE112.1@-2100,-2750
NetC37_2: C37.2 C38.2 DE97.2 U26.2 U27.1 | length 341
  Top Layer w18: DE97.2@-1415,-2820 -1406.26,-2811.26 -1395.47,-2811.26 -1390.64,-2811.26 -1341.32,-2811.26 -1333.82,-2803.76 -1333.82,-2796.26 -1333.82,-2788.76 -1358.82,-2763.76 U26.2@-1358.82,-2702.76 -1358.82,-2638.17 -1360.18,-2636.81 U27.1@-1362.64,-2636.81 ; C38.2@-1333.82,-2875 C37.2@-1333.82,-2812.2
  Top Layer w20: DE97.2@-1420,-2820 -1415,-2820 DE97.2@-1410,-2820
NetC39_2: C39.2 U26.5 | length 75.8
  Top Layer w15: U26.5@-1258.82,-2496.06 -1258.82,-2496.73 -1255.75,-2499.8 C39.2@-1185,-2499.8
NetD2_2: D2.2 DE97.1 | length 142.9
  Top Layer w15: D2.2@-1340,-2988.9 D2.2@-1340,-2980.04
  Top Layer w18: DE97.1@-1410,-2875 -1410,-2895 -1410,-2910.04 D2.2@-1340,-2980.04
NetDE11_2: DE11.2 R32.2 | length 126.5
  Top Layer w10: DE11.2@-4628.74,-2200 -4628.74,-2078.54 R32.2@-4625.2,-2075
NetDE12_1: DE12.1 R33.2 | length 126.5
  Top Layer w10: DE12.1@-4528.74,-2200 -4528.74,-2180 -4528.74,-2078.74 R33.2@-4525,-2075
NetDE49_1: DE49.1 DE57.2 R24.1 | length 135.6
  Top Layer w10: DE49.1@-4900,-1975 -4900,-1995 -4900,-2050 -4875,-2075 R24.1@-4849.8,-2075
NetDE49_2: DE49.2 R16.2 U18.7 | length 224.4
  Top Layer w10: DE49.2@-4850,-1975 -4835.86,-1989.14 -4825,-2000 R16.2@-4775,-2000 -4767.5,-2000 -4755,-1987.5 -4755,-1973.03 -4706.97,-1925 U18.7@-4675.47,-1925
NetDE50_1: DE50.1 DE58.2 R25.1 | length 135.6
  Top Layer w10: R25.1@-4300.2,-2075 -4275,-2075 -4250,-2050 -4250,-1995 DE50.1@-4250,-1975
NetDE50_2: DE50.2 R17.2 U18.8 | length 224.4
  Top Layer w10: U18.8@-4474.53,-1925 -4443.03,-1925 -4395,-1973.03 -4395,-1987.5 -4382.5,-2000 R17.2@-4375,-2000 -4325,-2000 -4314.14,-1989.14 DE50.2@-4300,-1975
NetDE51_1: DE51.1 DE59.2 R26.1 | length 135.6
  Top Layer w10: DE51.1@-4100,-1975 -4100,-1995 -4100,-2050 -4075,-2075 R26.1@-4049.8,-2075
NetDE51_2: DE51.2 R18.2 U19.7 | length 224.4
  Top Layer w10: DE51.2@-4050,-1975 -4035.86,-1989.14 -4025,-2000 R18.2@-3975,-2000 -3967.5,-2000 -3955,-1987.5 -3955,-1973.03 -3906.97,-1925 U19.7@-3875.47,-1925
NetDE52_1: DE52.1 DE60.2 R27.1 | length 135.6
  Top Layer w10: R27.1@-3500.2,-2075 -3475,-2075 -3450,-2050 -3450,-1995 DE52.1@-3450,-1975
NetDE52_2: DE52.2 R19.2 U19.8 | length 224.4
  Top Layer w10: U19.8@-3674.53,-1925 -3643.03,-1925 -3595,-1973.03 -3595,-1987.5 -3582.5,-2000 R19.2@-3575,-2000 -3525,-2000 -3514.14,-1989.14 DE52.2@-3500,-1975
NetDE53_1: DE53.1 DE61.2 R28.1 | length 135.6
  Top Layer w10: DE53.1@-3300,-1975 -3300,-1995 -3300,-2050 -3275,-2075 R28.1@-3249.8,-2075
NetDE53_2: DE53.2 R20.2 U20.7 | length 224.4
  Top Layer w10: DE53.2@-3250,-1975 -3235.86,-1989.14 -3225,-2000 R20.2@-3175,-2000 -3167.5,-2000 -3155,-1987.5 -3155,-1973.03 -3106.97,-1925 U20.7@-3075.47,-1925
NetDE54_1: DE54.1 DE62.2 R29.1 | length 135.6
  Top Layer w10: R29.1@-2700.2,-2075 -2675,-2075 -2650,-2050 -2650,-1995 DE54.1@-2650,-1975
NetDE54_2: DE54.2 R21.2 U20.8 | length 224.4
  Top Layer w10: U20.8@-2874.53,-1925 -2843.03,-1925 -2795,-1973.03 -2795,-1987.5 -2782.5,-2000 R21.2@-2775,-2000 -2725,-2000 -2714.14,-1989.14 DE54.2@-2700,-1975
NetDE55_1: DE55.1 DE63.2 R30.1 | length 135.6
  Top Layer w10: DE55.1@-2500,-1975 -2500,-1995 -2500,-2050 -2475,-2075 R30.1@-2449.8,-2075
NetDE55_2: DE55.2 R22.2 U21.7 | length 224.4
  Top Layer w10: DE55.2@-2450,-1975 -2435.86,-1989.14 -2425,-2000 R22.2@-2375,-2000 -2367.5,-2000 -2355,-1987.5 -2355,-1973.03 -2306.97,-1925 U21.7@-2275.47,-1925
NetDE56_1: DE56.1 DE64.2 R31.1 | length 135.6
  Top Layer w10: R31.1@-1900.2,-2075 -1875,-2075 -1850,-2050 -1850,-1995 DE56.1@-1850,-1975
NetDE56_2: DE56.2 R23.2 U21.8 | length 224.4
  Top Layer w10: U21.8@-2074.53,-1925 -2043.03,-1925 -1995,-1973.03 -1995,-1987.5 -1982.5,-2000 R23.2@-1975,-2000 -1925,-2000 -1914.14,-1989.14 DE56.2@-1900,-1975
NetDE57_1: DE57.1 R80.2 RP1.1 U18.1 U18.2 | length 642.6
  Top Layer w10: DE57.1@-4925,-1900 -4924.79,-1899.79 -4924.79,-1880 -4924.79,-1646.44 -4899.99,-1621.63 -4810.17,-1621.63 -4793.62,-1638.18 -4793.62,-1656.38 RP1.1@-4775,-1675 U18.2@-4675.47,-1675 U18.1@-4675.47,-1625 ; -4875,-1621.63 R80.2@-4875,-1575
NetDE58_1: DE58.1 R83.2 RP5.1 U18.13 U18.14 | length 639.2
  Top Layer w10: U18.13@-4474.53,-1675 U18.14@-4474.53,-1625 -4331.6,-1625 -4314.79,-1641.81 -4314.79,-1656.47 -4294.25,-1677.01 -4254.79,-1677.01 -4225,-1706.8 -4225,-1880 DE58.1@-4225,-1900 ; RP5.1@-4294.25,-1671.02 -4275,-1651.77 R83.2@-4275,-1575
NetDE59_1: DE59.1 R84.2 RP2.1 U19.1 U19.2 | length 642.6
  Top Layer w10: DE59.1@-4125,-1900 -4124.79,-1899.79 -4124.79,-1880 -4124.79,-1646.44 -4099.99,-1621.63 -4010.17,-1621.63 -3993.62,-1638.18 -3993.62,-1656.38 RP2.1@-3975,-1675 U19.2@-3875.47,-1675 U19.1@-3875.47,-1625 ; -4075,-1621.63 R84.2@-4075,-1575
NetDE60_1: DE60.1 R87.2 RP6.1 U19.13 U19.14 | length 639.2
  Top Layer w10: U19.13@-3674.53,-1675 U19.14@-3674.53,-1625 -3531.6,-1625 -3514.79,-1641.81 -3514.79,-1656.47 -3494.25,-1677.01 -3454.79,-1677.01 -3425,-1706.8 -3425,-1880 DE60.1@-3425,-1900 ; RP6.1@-3494.25,-1671.02 -3475,-1651.77 R87.2@-3475,-1575
NetDE61_1: DE61.1 R88.2 RP3.1 U20.1 U20.2 | length 642.6
  Top Layer w10: DE61.1@-3325,-1900 -3324.79,-1899.79 -3324.79,-1880 -3324.79,-1646.44 -3299.99,-1621.63 -3210.17,-1621.63 -3193.62,-1638.18 -3193.62,-1656.38 RP3.1@-3175,-1675 U20.2@-3075.47,-1675 U20.1@-3075.47,-1625 ; -3275,-1621.63 R88.2@-3275,-1575
NetDE62_1: DE62.1 R91.2 RP7.1 U20.13 U20.14 | length 639.2
  Top Layer w10: U20.13@-2874.53,-1675 U20.14@-2874.53,-1625 -2731.6,-1625 -2714.79,-1641.81 -2714.79,-1656.47 -2694.25,-1677.01 -2654.79,-1677.01 -2625,-1706.8 -2625,-1880 DE62.1@-2625,-1900 ; RP7.1@-2694.25,-1671.02 -2675,-1651.77 R91.2@-2675,-1575
NetDE63_1: DE63.1 R92.2 RP4.1 U21.1 U21.2 | length 642.6
  Top Layer w10: DE63.1@-2525,-1900 -2524.79,-1899.79 -2524.79,-1880 -2524.79,-1646.44 -2499.99,-1621.63 -2410.17,-1621.63 -2393.62,-1638.18 -2393.62,-1656.38 RP4.1@-2375,-1675 U21.2@-2275.47,-1675 U21.1@-2275.47,-1625 ; -2475,-1621.63 R92.2@-2475,-1575
NetDE64_1: DE64.1 R95.2 RP8.1 U21.13 U21.14 | length 639.2
  Top Layer w10: U21.13@-2074.53,-1675 U21.14@-2074.53,-1625 -1931.6,-1625 -1914.79,-1641.81 -1914.79,-1656.47 -1894.25,-1677.01 -1854.79,-1677.01 -1825,-1706.8 -1825,-1880 DE64.1@-1825,-1900 ; RP8.1@-1894.25,-1671.02 -1875,-1651.77 R95.2@-1875,-1575
NetDE65_2: DE65.2 R24.2 R32.1 | length 150
  Top Layer w10: DE65.2@-4775,-2150 -4775,-2130 R24.2@-4775,-2075 R32.1@-4700,-2075
NetDE66_2: DE66.2 R25.2 R33.1 | length 150.2
  Top Layer w10: R33.1@-4450.2,-2075 R25.2@-4375,-2075 -4375,-2130 DE66.2@-4375,-2150
NetDE67_2: DE67.2 R26.2 R34.1 | length 150
  Top Layer w10: DE67.2@-3975,-2150 -3975,-2130 -3975,-2075 R34.1@-3900,-2075
NetDE68_2: DE68.2 R27.2 R35.1 | length 150.2
  Top Layer w10: R35.1@-3650.2,-2075 -3575,-2075 -3575,-2130 DE68.2@-3575,-2150
NetDE69_2: DE69.2 R28.2 R36.1 | length 150
  Top Layer w10: DE69.2@-3175,-2150 -3175,-2130 -3175,-2075 R36.1@-3100,-2075
NetDE70_2: DE70.2 R29.2 R37.1 | length 150.2
  Top Layer w10: R37.1@-2850.2,-2075 -2775,-2075 -2775,-2130 DE70.2@-2775,-2150
NetDE71_2: DE71.2 R30.2 R38.1 | length 150
  Top Layer w10: DE71.2@-2375,-2150 -2375,-2130 R30.2@-2375,-2075 R38.1@-2300,-2075
NetDE72_2: DE72.2 R31.2 R39.1 | length 150.2
  Top Layer w10: R39.1@-2050.2,-2075 R31.2@-1975,-2075 -1975,-2130 DE72.2@-1975,-2150
NetDE73_1: DE73.1 DE81.2 R56.1 | length 135.6
  Top Layer w10: DE73.1@-4900,-3325 -4900,-3345 -4900,-3400 -4875,-3425 R56.1@-4849.8,-3425
NetDE73_2: DE73.2 R48.2 U22.7 | length 224.4
  Top Layer w10: DE73.2@-4850,-3325 -4835.86,-3339.14 -4825,-3350 R48.2@-4775,-3350 -4767.5,-3350 -4755,-3337.5 -4755,-3323.03 -4706.97,-3275 U22.7@-4675.47,-3275
NetDE74_1: DE74.1 DE113.1 R57.1 | length 135.6
  Top Layer w10: R57.1@-4300.2,-3425 -4275,-3425 -4250,-3400 -4250,-3345 DE74.1@-4250,-3325
NetDE74_2: DE74.2 R49.2 U22.8 | length 224.4
  Top Layer w10: U22.8@-4474.53,-3275 -4443.03,-3275 -4395,-3323.03 -4395,-3337.5 -4382.5,-3350 R49.2@-4375,-3350 -4325,-3350 -4314.14,-3339.14 DE74.2@-4300,-3325
NetDE75_1: DE75.1 DE83.2 R58.1 | length 135.6
  Top Layer w10: DE75.1@-4100,-3325 -4100,-3345 -4100,-3400 -4075,-3425 R58.1@-4049.8,-3425
NetDE75_2: DE75.2 R50.2 U23.7 | length 224.4
  Top Layer w10: DE75.2@-4050,-3325 -4035.86,-3339.14 -4025,-3350 -3975,-3350 -3967.5,-3350 -3955,-3337.5 -3955,-3323.03 -3906.97,-3275 U23.7@-3875.47,-3275
NetDE76_1: DE76.1 DE84.2 R59.1 | length 135.6
  Top Layer w10: R59.1@-3500.2,-3425 -3475,-3425 -3450,-3400 -3450,-3345 DE76.1@-3450,-3325
NetDE76_2: DE76.2 R51.2 U23.8 | length 224.4
  Top Layer w10: U23.8@-3674.53,-3275 -3643.03,-3275 -3595,-3323.03 -3595,-3337.5 -3582.5,-3350 -3575,-3350 -3525,-3350 -3514.14,-3339.14 DE76.2@-3500,-3325
NetDE77_1: DE77.1 DE85.2 R60.1 | length 135.6
  Top Layer w10: DE77.1@-3300,-3325 -3300,-3345 -3300,-3400 -3275,-3425 R60.1@-3249.8,-3425
NetDE77_2: DE77.2 R52.2 U24.7 | length 224.4
  Top Layer w10: DE77.2@-3250,-3325 -3235.86,-3339.14 -3225,-3350 R52.2@-3175,-3350 -3167.5,-3350 -3155,-3337.5 -3155,-3323.03 -3106.97,-3275 U24.7@-3075.47,-3275
NetDE78_1: DE78.1 DE86.2 R61.1 | length 135.6
  Top Layer w10: R61.1@-2700.2,-3425 -2675,-3425 -2650,-3400 -2650,-3345 DE78.1@-2650,-3325
NetDE78_2: DE78.2 R53.2 U24.8 | length 224.4
  Top Layer w10: U24.8@-2874.53,-3275 -2843.03,-3275 -2795,-3323.03 -2795,-3337.5 -2782.5,-3350 R53.2@-2775,-3350 -2725,-3350 -2714.14,-3339.14 DE78.2@-2700,-3325
NetDE79_1: DE79.1 DE87.2 R62.1 | length 135.6
  Top Layer w10: DE79.1@-2500,-3325 -2500,-3345 -2500,-3400 -2475,-3425 R62.1@-2449.8,-3425
NetDE79_2: DE79.2 R54.2 U25.7 | length 224.4
  Top Layer w10: DE79.2@-2450,-3325 -2435.86,-3339.14 -2425,-3350 R54.2@-2375,-3350 -2367.5,-3350 -2355,-3337.5 -2355,-3323.03 -2306.97,-3275 U25.7@-2275.47,-3275
NetDE80_1: DE80.1 DE88.2 R63.1 | length 135.6
  Top Layer w10: R63.1@-1900.2,-3425 -1875,-3425 -1850,-3400 -1850,-3345 DE80.1@-1850,-3325
NetDE80_2: DE80.2 R55.2 U25.8 | length 224.4
  Top Layer w10: U25.8@-2074.53,-3275 -2043.03,-3275 -1995,-3323.03 -1995,-3337.5 -1982.5,-3350 R55.2@-1975,-3350 -1925,-3350 -1914.14,-3339.14 DE80.2@-1900,-3325
NetDE81_1: DE81.1 R96.2 RP9.1 U22.1 U22.2 | length 642.6
  Top Layer w10: DE81.1@-4925,-3250 -4924.79,-3249.79 -4924.79,-2996.44 -4899.99,-2971.63 -4875,-2971.63 ; R96.2@-4875,-2925 -4875,-2971.63 ; U22.1@-4675.47,-2975 U22.2@-4675.47,-3025 RP9.1@-4775,-3025 -4793.62,-3006.38 -4793.62,-2988.18 -4810.17,-2971.63 -4875,-2971.63
NetDE83_1: DE83.1 R100.2 RP10.1 U23.1 U23.2 | length 642.6
  Top Layer w10: DE83.1@-4125,-3250 -4124.79,-3249.79 -4124.79,-3230 -4124.79,-2996.44 -4099.99,-2971.63 -4010.17,-2971.63 -3993.62,-2988.18 -3993.62,-3006.38 RP10.1@-3975,-3025 U23.2@-3875.47,-3025 U23.1@-3875.47,-2975 ; -4075,-2971.63 R100.2@-4075,-2925
NetDE84_1: DE84.1 R103.2 RP14.1 U23.13 U23.14 | length 639.2
  Top Layer w10: U23.13@-3674.53,-3025 U23.14@-3674.53,-2975 -3531.6,-2975 -3514.79,-2991.81 -3514.79,-3006.47 -3494.25,-3027.01 -3454.79,-3027.01 -3425,-3056.8 -3425,-3230 DE84.1@-3425,-3250 ; RP14.1@-3494.25,-3021.02 -3475,-3001.77 R103.2@-3475,-2925
NetDE85_1: DE85.1 R104.2 RP11.1 U24.1 U24.2 | length 642.6
  Top Layer w10: DE85.1@-3325,-3250 -3324.79,-3249.79 -3324.79,-3230 -3324.79,-2996.44 -3299.99,-2971.63 -3210.17,-2971.63 -3193.62,-2988.18 -3193.62,-3006.38 RP11.1@-3175,-3025 U24.2@-3075.47,-3025 U24.1@-3075.47,-2975 ; -3275,-2971.63 R104.2@-3275,-2925
NetDE86_1: DE86.1 R107.2 RP15.1 U24.13 U24.14 | length 639.2
  Top Layer w10: U24.13@-2874.53,-3025 U24.14@-2874.53,-2975 -2731.6,-2975 -2714.79,-2991.81 -2714.79,-3006.47 -2694.25,-3027.01 -2654.79,-3027.01 -2625,-3056.8 -2625,-3230 DE86.1@-2625,-3250 ; RP15.1@-2694.25,-3021.02 -2675,-3001.77 R107.2@-2675,-2925
NetDE87_1: DE87.1 R108.2 RP12.1 U25.1 U25.2 | length 642.6
  Top Layer w10: DE87.1@-2525,-3250 -2524.79,-3249.79 -2524.79,-3230 -2524.79,-2996.44 -2499.99,-2971.63 -2410.17,-2971.63 -2393.62,-2988.18 -2393.62,-3006.38 RP12.1@-2375,-3025 U25.2@-2275.47,-3025 U25.1@-2275.47,-2975 ; -2475,-2971.63 R108.2@-2475,-2925
NetDE88_1: DE88.1 R111.2 RP16.1 U25.13 U25.14 | length 645.2
  Top Layer w10: U25.13@-2074.53,-3025 U25.14@-2074.53,-2975 -1931.6,-2975 -1914.79,-2991.81 -1914.79,-3006.47 RP16.1@-1896.26,-3025 RP16.1@-1894.25,-3027.01 ; R111.2@-1875,-2925 -1875,-3001.77 -1894.25,-3021.02 RP16.1@-1894.25,-3027.01 ; DE88.1@-1825,-3250 -1825,-3230 -1825,-3056.8 -1854.79,-3027.01 RP16.1@-1894.25,-3027.01
NetDE89_2: DE89.2 R56.2 R64.1 | length 150
  Top Layer w10: DE89.2@-4775,-3500 -4775,-3480 -4775,-3425 R64.1@-4700,-3425
NetDE90_2: DE90.2 R57.2 R65.1 | length 150
  Top Layer w10: R65.1@-4450,-3425 R57.2@-4375,-3425 -4375,-3480 DE90.2@-4375,-3500
NetDE91_2: DE91.2 R58.2 R66.1 | length 150
  Top Layer w10: DE91.2@-3975,-3500 -3975,-3480 -3975,-3425 R66.1@-3900,-3425